# Altium PCB Kasli-DIOT.PCBDOC (part 10 of 23)
Units mm, origin at the board's own origin, x right, y up, seen from the top; angles counter-clockwise.
Board outline 222.9 x 100 mm, 10 copper layers (TopLayer, Layer 2, Layer 3, Layer 4, Layer 5, Layer 6, Layer 7, layer 8, Layer 9, BottomLayer), stack 1.564 mm thick; 977 components, 900 nets, 4676 pads, 2725 vias.
Unrouted connection lines stored in the file: 17.
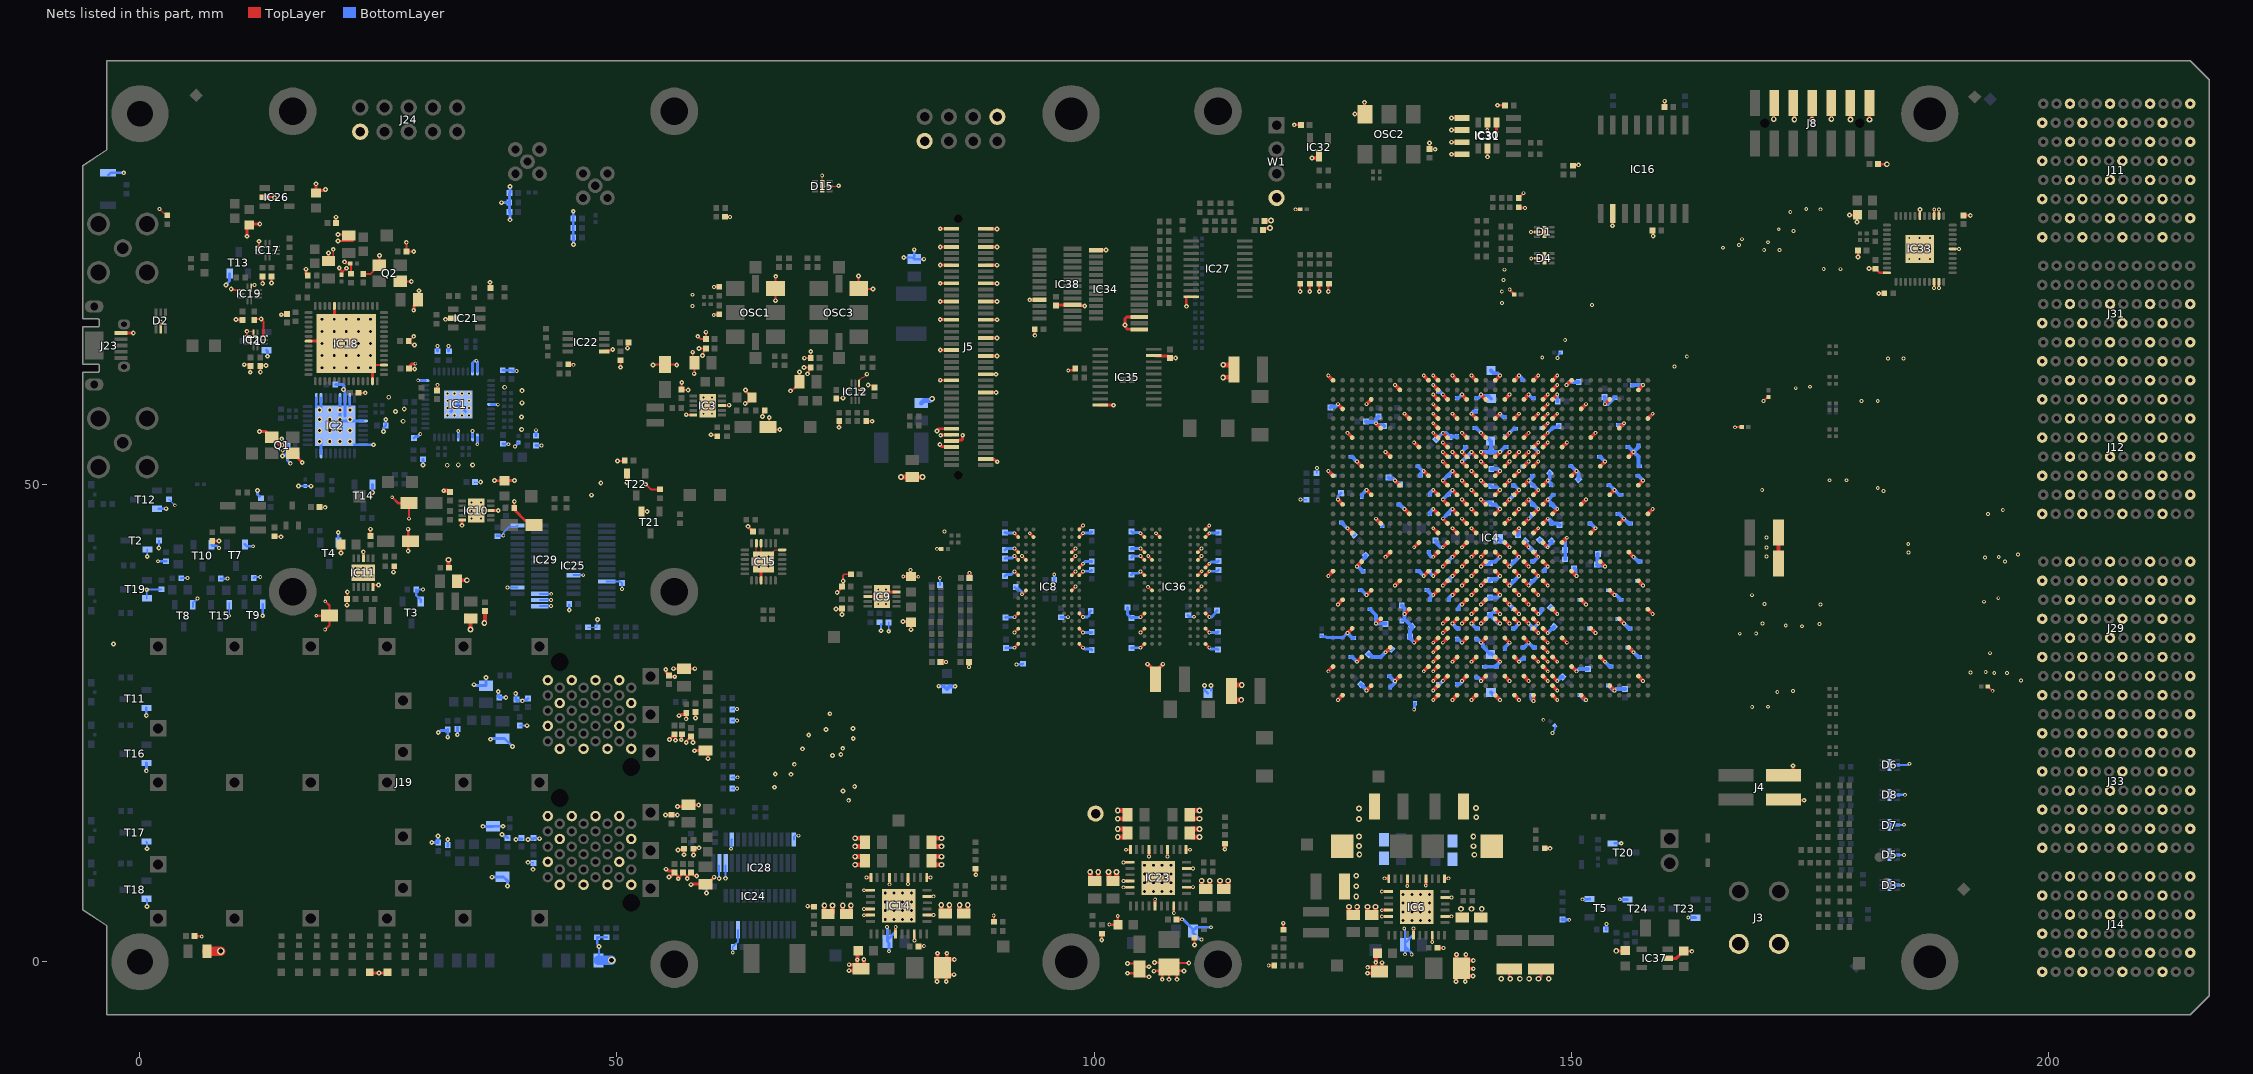
[diagram p16: the nets of this part, all layers, seen from the top]

## Via types
v1: diameter 0.4, hole 0.2, TopLayer to BottomLayer, tented both sides, 1723 vias
v2: diameter 0.5, hole 0.2, TopLayer to BottomLayer, tented both sides, 524 vias
v3: diameter 0.6, hole 0.3, TopLayer to BottomLayer, tented both sides, 172 vias
v4: diameter 0.6, hole 0.3, TopLayer to BottomLayer, 113 vias
v5: diameter 0.5, hole 0.2, TopLayer to BottomLayer, 107 vias
v6: diameter 0.4, hole 0.2, TopLayer to BottomLayer, 67 vias
v7: diameter 0.5, hole 0.25, TopLayer to BottomLayer, tented both sides, 12 vias
v8: diameter 0.8, hole 0.5, TopLayer to BottomLayer, tented both sides, 7 vias

## Nets (pads, with @x,y where several pads share a name; then routed paths per layer and width w, separated by ;. In a path a pad name is that pad's centre, name@x,y a point inside that pad or via, vN(x,y) a via of type N, cw(c..) or ccw(c..) an arc to the next point about the centre after c; other vN are vias at no path point) (continued)
GND: C3.1 C9.2 C12.1 C13.2 C15.1 C16.1 C17.1 C18.1 C19.2 C22.1 C23.1 C24.1 C25.1 C26.1 C27.1 C28.1 C29.1 C30.2 C31.1 C32.2 C33.1 C34.1 C35.1 C36.1 C37.1 C38.1 C39.1 C40.1 C42.1 C43.1 C44.1 C45.2 C46.1 C47.1 C48.1 C49.1 C50.1 C52.1 C53.1 C55.1 C56.1 C57.1 C58.1 C59.1 C60.1 C61.1 C62.1 C64.1 C65.1 C66.1 C67.1 C68.1 C69.1 C75.1 C76.1 C78.1 C79.1 C80.1 C81.1 C82.1 C83.1 C84.1 C85.1 C86.1 C87.1 C88.1 C89.1 C90.1 C91.2 C92.1 C93.1 C94.1 C95.1 C96.1 C97.1 C98.1 C99.1 C101.1 C102.1 C103.1 C104.1 C105.1 C106.1 C107.1 C108.1 C109.1 C110.1 C111.1 C112.1 C113.1 C114.1 C115.1 C116.1 C117.1 C118.1 C119.1 C120.1 C121.1 C122.1 C123.1 C124.1 C125.1 C126.1 C127.1 C128.1 C129.1 C130.1 C131.1 C132.1 C133.1 C134.1 C135.1 C136.1 C137.1 C138.1 C139.1 C140.1 C143.1 C144.1 C145.1 C146.1 C147.1 C148.1 C149.1 C150.1 C151.1 C152.1 C153.1 C154.1 C155.1 C156.1 C158.1 C160.1 C161.1 C162.1 C163.1 C164.1 C165.1 C166.1 C167.1 C168.1 C169.1 C170.1 C171.1 C172.1 C173.1 C174.1 C175.1 C176.1 C177.1 C178.1 C179.1 C180.1 C181.1 C182.1 C183.1 C184.1 C185.1 C186.1 C187.1 C190.1 C191.1 C192.1 C193.1 C194.1 C195.1 C196.1 C197.1 C198.1 C199.1 C200.2 C201.2 C202.1 C203.2 C204.1 C205.1 C206.1 C207.1 C208.1 C209.1 C210.1 C211.1 C212.1 C213.1 C214.1 C215.1 C216.1 C217.1 C218.1 C219.1 C220.2 C221.1 C222.1 C223.1 C224.1 C225.2 C226.1 C227.1 C234.1 C235.1 C238.1 C239.1 C240.1 C241.1 C242.1 C243.1 C244.1 C245.2 C259.1 C260.1 C261.1 C262.1 C263.1 C264.1 C265.1 C266.1 C267.1 C268.1 C269.1 C270.1 C271.1 C272.1 C273.1 C274.1 C275.1 C276.1 C277.1 C278.1 C279.1 C280.1 C281.1 C286.2 C287.1 C288.1 C289.1 C290.1 C291.1 C292.1 C293.1 C295.2 C296.1 C297.2 C298.1 C299.1 C300.2 C301.1 C302.1 C303.1 C304.1 C305.1 C306.1 C307.1 C308.1 C309.1 C310.1 C311.1 C312.1 C313.1 C314.1 C315.1 C316.1 C317.1 C318.1 C319.1 C320.1 C321.1 C322.1 C323.1 C324.1 C325.1 C326.1 C327.1 C328.1 C329.1 C330.1 C331.1 C332.1 C333.1 C334.1 C335.1 C336.1 C337.1 C338.1 C340.1 C341.1 C342.1 C343.1 C344.1 C345.1 C346.2 C347.1 C348.1 C349.1 C350.1 C351.1 C352.1 C353.1 C354.1 C355.1 C356.1 C357.1 C358.1 C359.1 C360.1 C361.1 C362.2 C363.2 C364.2 C365.2 C366.1 C367.1 C368.1 C369.1 C370.1 C371.1 C372.1 C373.1 C374.1 C375.1 C376.1 C377.1 C378.1 C379.1 C380.1 C381.1 C382.1 C383.1 C384.1 C385.1 C386.1 C387.1 C388.1 C389.1 C390.1 C391.1 C396.2 C404.1 C406.1 C407.1 C408.1 C409.1 C412.1 C419.1 C420.1 C422.2 C423.1 C424.1 C425.1 C427.1 C428.1 C429.1 C430.1 C431.1 C432.1 C433.1 C451.1 C452.1 C453.1 C454.1 C455.1 C456.1 C457.1 C458.1 C459.1 C460.1 C461.1 C462.1 C463.1 C464.1 C465.1 C466.1 C467.1 C468.1 C469.1 C470.1 C471.1 C472.1 C473.1 C474.1 C475.1 C476.1 C477.1 C478.1 C480.1 C481.1 C482.1 C483.1 C484.1 C485.1 D1.2 D1.7 D2.2 D3.2 D3.7 D4.2 D4.7 D5.2 D5.7 D6.2 D6.7 D7.2 D7.7 D8.2 D8.7 D15.2 D15.7 IC1.2 IC1.3 IC1.6 IC1.22 IC1.31 IC1.32 IC1.39 IC1.45 IC2.8 IC2.19 IC2.20 IC2.24 IC2.25 IC2.26 IC2.31 IC2.36 IC2.37 IC3.5 IC3.8 IC3.11 IC4.A1 IC4.A11 IC4.A12 IC4.A14 IC4.A16 IC4.A18 IC4.A20 IC4.A22 IC4.A24 IC4.A26 IC4.AA1 IC4.AA11 IC4.AA12 IC4.AA14 IC4.AA16 IC4.AA18 IC4.AA20 IC4.AA22 IC4.AA26 IC4.AB8 IC4.AB13 IC4.AB15 IC4.AB17 IC4.AB19 IC4.AB21 IC4.AB23 IC4.AB33 IC4.AC5 IC4.AC12 IC4.AC14 IC4.AC16 IC4.AC18 IC4.AC20 IC4.AC22 IC4.AC30 IC4.AD2 IC4.AD15 IC4.AD17 IC4.AD19 IC4.AD21 IC4.AD27 IC4.AE9 IC4.AE16 IC4.AE18 IC4.AE20 IC4.AE22 IC4.AE24 IC4.AE34 IC4.AF6 IC4.AF13 IC4.AF14 IC4.AF15 IC4.AF16 IC4.AF17 IC4.AF18 IC4.AF19 IC4.AF20 IC4.AF21 IC4.AF22 IC4.AF31 IC4.AG3 IC4.AG13 IC4.AG22 IC4.AG23 IC4.AG28 IC4.AH10 IC4.AH12 IC4.AH13 IC4.AH15 IC4.AH17 IC4.AH19 IC4.AH21 IC4.AH23 IC4.AH25 IC4.AJ7 IC4.AJ12 IC4.AJ23 IC4.AJ32 IC4.AK4 IC4.AK12 IC4.AK14 IC4.AK16 IC4.AK18 IC4.AK20 IC4.AK22 IC4.AK23 IC4.AK24 IC4.AK29 IC4.AL1 IC4.AL11 IC4.AL12 IC4.AL23 IC4.AL26 IC4.AM8 IC4.AM12 IC4.AM13 IC4.AM15 IC4.AM17 IC4.AM19 IC4.AM21 IC4.AM23 IC4.AM24 IC4.AM33 IC4.AN5 IC4.AN12 IC4.AN24 IC4.AN30 IC4.AP2 IC4.AP12 IC4.AP14 IC4.AP16 IC4.AP18 IC4.AP20 IC4.AP22 IC4.AP24 IC4.AP27 IC4.B8 IC4.B12 IC4.B24 IC4.B33 IC4.C5 IC4.C12 IC4.C13 IC4.C15 IC4.C17 IC4.C19 IC4.C21 IC4.C23 IC4.C24 IC4.C30 IC4.D2 IC4.D12 IC4.D23 IC4.D27 IC4.E9 IC4.E12 IC4.E14 IC4.E16 IC4.E18 IC4.E20 IC4.E22 IC4.E23 IC4.E24 IC4.E34 IC4.F6 IC4.F12 IC4.F23 IC4.F31 IC4.G3 IC4.G12 IC4.G13 IC4.G15 IC4.G17 IC4.G19 IC4.G21 IC4.G23 IC4.G28 IC4.H10 IC4.H13 IC4.H22 IC4.H23 IC4.H25 IC4.J7 IC4.J13 IC4.J14 IC4.J15 IC4.J16 IC4.J17 IC4.J18 IC4.J19 IC4.J20 IC4.J21 IC4.J22 IC4.J32 IC4.K4 IC4.K13 IC4.K15 IC4.K17 IC4.K19 IC4.K21 IC4.K22 IC4.K29 IC4.L1 IC4.L11 IC4.L14 IC4.L16 IC4.L18 IC4.L20 IC4.L26 IC4.M8 IC4.M13 IC4.M15 IC4.M17 IC4.M19 IC4.M21 IC4.M23 IC4.M33 IC4.N5 IC4.N12 IC4.N14 IC4.N16 IC4.N18 IC4.N20 IC4.N22 IC4.N30 IC4.P2 IC4.P13 IC4.P15 IC4.P17 IC4.P19 IC4.P21 IC4.P23 IC4.P27 IC4.R9 IC4.R12 IC4.R14 IC4.R16 IC4.R18 IC4.R20 IC4.R22 IC4.R24 IC4.R34 IC4.T6 IC4.T13 IC4.T15 IC4.T19 IC4.T21 IC4.T23 IC4.T31 IC4.U3 IC4.U12 IC4.U14 IC4.U16 IC4.U20 IC4.U22 IC4.U28 IC4.V10 IC4.V13 IC4.V15 IC4.V19 IC4.V21 IC4.V23 IC4.V25 IC4.W7 IC4.W12 IC4.W14 IC4.W16 IC4.W17 IC4.W18 IC4.W20 IC4.W22 IC4.W32 IC4.Y4 IC4.Y13 IC4.Y15 IC4.Y17 IC4.Y19 IC4.Y21 IC4.Y23 IC4.Y29 IC6.2 IC6.5 IC6.7 IC6.10 IC6.13 IC6.16 IC6.17 IC6.20 IC6.21 IC6.27 IC6.30 IC6.33 IC8.A9 IC8.B1 IC8.B3 IC8.B9 IC8.D1 IC8.D8 IC8.E1 IC8.E2 IC8.E8 IC8.F9 IC8.G1 IC8.G8 IC8.G9 IC8.J2 IC8.J8 IC8.M1 IC8.M9 IC8.P1 IC8.P9 IC8.T1 IC8.T9 IC9.4 IC9.8 IC9.11 IC10.5 IC10.8 IC10.11 IC11.5 IC11.8 IC11.11 IC12.2 IC12.3 IC14.2 IC14.5 IC14.7 IC14.10 IC14.13 IC14.16 IC14.17 IC14.20 IC14.21 IC14.27 IC14.30 IC14.33 IC15.9 IC15.18 IC15.22 IC15.23 IC15.25 IC16.10 IC17.3 IC18.10 IC18.21 IC18.41 IC18.45 IC18.57 IC19.1 IC19.3 IC20.2 IC20.3 IC20.10 IC21.2 IC22.1 IC23.2 IC23.5 IC23.7 IC23.10 IC23.13 IC23.16 IC23.17 IC23.20 IC23.21 IC23.27 IC23.30 IC23.33 IC24.10 IC24.16 IC24.17 IC25.10 IC25.15 IC25.16 IC25.17 IC26.2 IC27.10 IC28.2 IC28.12 IC29.2 IC29.12 IC29.21 IC30.2 IC30.4 IC30.5 IC31.1 IC31.2 IC31.3 IC31.4 IC32.3 IC33.2 IC33.3 IC33.6 IC33.22 IC33.31 IC33.32 IC33.39 IC33.45 IC34.10 IC34.15 IC34.17 IC35.10 IC35.19 IC36.A9 IC36.B1 IC36.B3 IC36.B9 IC36.D1 IC36.D8 IC36.E1 IC36.E2 IC36.E8 IC36.F9 IC36.G1 IC36.G8 IC36.G9 IC36.J2 IC36.J8 IC36.M1 IC36.M9 IC36.P1 IC36.P9 IC36.T1 IC36.T9 IC37.2 IC38.12 IC38.21 J3.1 J3.2 J4.2 J4.4 J5.1 J5.2 J5.7 J5.8 J5.13 J5.14 J5.19 J5.20 J5.25 J5.26 J5.31 J5.32 J5.37 J5.42 J5.43 J5.49 J5.52 J5.55 J5.68 J5.70 J5.72 J5.74 J5.77 J8.1 J8.3 J8.5 J8.7 J8.9 J8.11 J11.A2 J11.A4 J11.A6 J11.A8 J11.C1 J11.C3 J11.C5 J11.C7 J11.D2 J11.D4 J11.D6 J11.D8 J11.F1 J11.F3 J11.F5 J11.F7 J11.G2 J11.G4 J11.G6 J11.G8 J11.I1 J11.I3 J11.I5 J11.I7 J11.J2 J11.J4 J11.J6 J11.J8 J11.L1 J11.L3 J11.L5 J11.L7 J12.A2 J12.A4 J12.A6 J12.A8 J12.C1 J12.C3 J12.C5 J12.C7 J12.D2 J12.D4 J12.D6 J12.D8 J12.F1 J12.F3 J12.F5 J12.F7 J12.G2 J12.G4 J12.G6 J12.G8 J12.I1 J12.I3 J12.I5 J12.I7 J12.J2 J12.J4 J12.J6 J12.J8 J12.L1 J12.L3 J12.L5 J12.L7 J14.A2 J14.A4 J14.A6 J14.C1 J14.C5 J14.D2 J14.D4 J14.D6 J14.F1 J14.F5 J14.G2 J14.G4 J14.G6 J14.I1 J14.I3 J14.I5 J14.J2 J14.J4 J14.J6 J14.L1 J14.L3 J14.L5 J19.LB1 J19.LB10 J19.LB11 J19.LB14 J19.LB17 J19.LB20 J19.LT1 J19.LT10 J19.LT11 J19.LT14 J19.LT17 J19.LT20 J19.RB1 J19.RB10 J19.RB11 J19.RB14 J19.RB17 J19.RB20 J19.RT1 J19.RT10 J19.RT11 J19.RT14 J19.RT17 J19.RT20 J23.5 J24.10 J29.A2 J29.A4 J29.A6 J29.A8 J29.C1 J29.C3 J29.C5 J29.C7 J29.D2 J29.D4 J29.D6 J29.D8 J29.F1 J29.F3 J29.F5 J29.F7 J29.G2 J29.G4 J29.G6 J29.G8 J29.I1 J29.I3 J29.I5 J29.I7 J29.J2 J29.J4 J29.J6 J29.J8 J29.L1 J29.L3 J29.L5 J29.L7 J31.A2 J31.A4 J31.C1 J31.C3 J31.D2 J31.D4 J31.F1 J31.F3 J31.G2 J31.G4 J31.I1 J31.I3 J31.J2 J31.J4 J31.L1 J31.L3 J33.A2 J33.A4 J33.A6 J33.A8 J33.C1 J33.C3 J33.C5 J33.C7 J33.D2 J33.D4 J33.D6 J33.D8 J33.F1 J33.F3 J33.F5 J33.F7 J33.G2 J33.G4 J33.G6 J33.G8 J33.I1 J33.I3 J33.I5 J33.I7 J33.J2 J33.J4 J33.J6 J33.L1 J33.L3 J33.L5 J33.L7 L5.1 LD9.1 LD10.1 OSC1.3 OSC2.3 OSC3.3 Q1.2 Q1.4 Q2.2 Q2.4 R2.1 R7.2 R8.2 R9.1 R13.1 R17.1 R18.1 R19.1 R23.1 R24.1 R25.1 R26.1 R28.1 R29.1 R30.1 R32.1 R33.1 R37.1 R43.1 R45.1 R46.1 R47.1 R60.1 R64.1 R68.2 R70.2 R99.1 R100.1 R125.2 R129.1 R130.1 R140.1 R141.1 R153.1 R154.2 R155.1 R157.1 R166.1 R167.1 R168.1 R169.1 R172.1 R173.1 R193.1 R199.1 R201.1 R208.1 R211.1 R213.1 R214.1 R215.1 R222.1 R223.1 R227.1 R240.1 R243.1 R246.1 R247.1 R251.1 R252.2 R255.1 R256.2 R261.1 R301.1 R304.1 R305.1 R306.2 R307.2 R308.2 R310.2 SW1.2 T1.2 T2.2 T3.2 T4.2 T5.2 T7.2 T8.2 T9.2 T10.2 T11.2 T12.2 T13.2 T14.2 T15.2 T16.2 T17.2 T18.2 T19.2 T20.2 T21.2 T22.2 T23.2 T24.2 TP28.1 TP33.1 TP35.1 W1.4 | length 995.1
  TopLayer w0.095: C296.1@18.786,47.623 18.804,47.641 v2(19.414,47.641)
  TopLayer w0.125: v1(2.034,78.911) 2.472,78.474 2.632,78.474 R301.1@2.859,78.246 ; D2.2@2.181,66.374 v1(2.181,67.125) ; v2(11.201,66.085) 11.871,66.085 11.901,66.055 IC20.2@11.901,65.889 ; R13.1@14.082,44.583 R13.1@14.082,44.583 ; IC15.23@64.611,43.879 64.611,42.679 65.111,42.179 IC15.25@65.361,41.929 66.611,43.179 IC15.18@67.311,43.179 ; v1(71.507,82.418) 71.511,82.414 D15.7@71.511,81.3 D15.2@72.271,81.3 73.19,81.3 v2(73.236,81.346) v2@73.164,81.274 ; C29.1@72.986,59.15 73.025,59.111 v2(73.695,59.111) ; IC12.2@75.7,59.964 IC12.2@75.686,59.95 75.435,59.95 75.4,59.985 75.4,60.636 IC12.3@75.386,60.65 75.386,60.95 75.727,61.291 75.877,61.291 v2(76.186,61.6) ; v2(76.325,60.453) 76.33,60.447 76.86,60.447 C28.1@77.097,60.211
  TopLayer w0.127: IC15.25@65.111,42.179 IC15.22@65.111,43.879
  TopLayer w0.15: IC19.3@10.566,70.415 IC19.3@10.839,70.415 ; IC19.1@11.666,70.665 11.666,70.922 11.689,70.945 12.006,70.945 v6(12.011,70.95)
  TopLayer w0.2: v2(9.561,70.525) 9.671,70.415 IC19.3@10.566,70.415 ; v2(10.926,62.59) 11.456,62.59 C218.1@11.593,62.453 11.563,62.423 v2(11.563,61.797) ; IC20.3@11.201,65.589 v2(11.201,66.085) ; C215.1@11.974,67.379 v2(12.705,67.379) 12.936,67.148 12.936,65.654 IC20.10@13.001,65.589 ; IC17.3@12.461,74.997 v2(12.461,75.525) ; v2(12.613,61.831) 12.613,62.501 12.615,62.5 v2(13.214,62.5) ; v2(12.863,71.113) C217.1@12.863,71.951 ; IC26.2@13.061,80.15 14.054,80.15 v2(14.086,80.118) ; v2(13.783,71.162) C293.1@13.783,71.855 ; R13.1@14.082,44.583 14.101,44.567 14.753,44.567 v2(14.77,44.55) ; C211.1@19.192,73.63 19.761,73.63 v2(19.761,74.3) ; C211.1@20.261,73.387 v2(20.261,74.682) ; v2(20.761,75.55) 22.352,75.55 21.652,76.25 v2(20.761,76.25) ; v2(20.886,72.725) 20.886,72.69 21.118,72.458 ; v2(21.444,73.373) 21.626,73.19 C210.1@22.038,73.19 ; v2(21.636,72.7) 21.352,72.416 ; v2(21.711,37.387) C15.1@21.711,38.037 21.736,38.062 v2(21.736,38.762) ; R199.1@22.134,72.136 C210.1@22.134,73.094 ; C409.1@22.899,59.64 v2(23.614,59.64) ; C208.1@23.404,72.116 24.19,72.116 Q2.2@25.098,73.024 v2(25.098,74.036) ; IC18.57@23.876,62.558 IC18.45@25.576,62.558 IC18.45@25.576,62.608 ; IC11.5@24.411,39.287 24.461,39.337 24.461,39.495 v2(24.988,39.495) ; v2(26.572,40.842) 26.603,40.874 R252.2@26.603,41.434 ; Q2.4@27.298,71.324 v2(28.445,71.324) ; v2(27.918,75.418) C207.1@27.918,74.46 v2(28.696,74.46) ; v2(28.697,65.562) 28.672,65.562 C222.1@28.172,65.062 28.534,64.7 28.715,64.7 v2(28.773,64.643) ; v2@36.667,71.269 v2(36.702,71.234) ; C216.1@36.891,70.79 C216.1@36.906,70.775 ; IC22.1@48.661,63.975 48.761,64.075 49.345,64.075 49.525,64.255 v2@49.607,64.255 ; v2(50.061,52.5) 50.741,52.5 R46.1@50.791,52.55 ; v2(50.361,62.325) R208.1@50.361,63.08 ; v2(51.061,50.25) T22.2@51.061,51.2 ; v2(51.111,64.325) C221.1@51.111,64.95 ; T21.2@52.561,47.2 v2(53.161,47.2) ; v2(53.011,50.05) 53.54,49.52 R33.1@54.511,49.52 ; v2(53.761,62.55) 53.811,62.6 C9.2@55.011,62.6 56.211,62.6 v2(56.261,62.55) ; v2(56.786,60.725) 56.766,60.705 56.766,60.005 C12.1@56.761,60 56.811,59.95 v2(57.461,59.95) ; v2(57.261,57.35) 57.286,57.325 57.986,57.325 IC3.5@58.011,57.3 ; v2(57.936,63.9) 57.941,63.895 57.941,62.97 C288.1@58.111,62.8 58.111,61.675 v2(58.086,61.65) ; v5(58.236,25.55) C276.1@58.235,26.193 ; v2(58.469,65.561) 58.475,65.561 58.736,65.3 C226.1@59.311,65.3 v2(59.311,66) ; v2(58.586,64.3) C287.1@59.311,64.3 59.101,64.09 59.101,64.013 59.061,63.973 59.061,63.828 59.026,63.793 59.026,63.618 v2(58.969,63.561) ; v2(59.861,55.25) 59.918,55.192 60.399,55.192 R251.1@60.511,55.08 ; IC3.8@61.011,58.3 61.036,58.325 61.736,58.325 v2(61.761,58.35) ; v2(65.261,57.15) 65.318,57.207 65.318,57.637 R28.1@65.481,57.8 ; v2(65.961,57.05) 65.961,56.2 C19.2@65.811,56.05 66.061,55.8 v2(67.061,55.8) ; v2(66.611,69.3) OSC1.3@66.611,70.59 66.611,71.825 v2(66.636,71.85) ; v2(68.186,59.85) 68.336,59.85 68.686,60.2 68.686,60.239 C289.1@68.886,60.439 ; v2(69.136,61.825) 69.136,60.825 C289.1@69.111,60.8 ; C289.1@69.527,60.284 69.372,60.439 C289.1@68.886,60.439 ; v2(69.611,62.3) C290.1@70.311,62.3 70.161,62.15 70.161,61.908 69.969,61.717 v2(69.969,61.636) ; v2(69.636,63.275) 70.286,63.275 C291.1@70.311,63.3 v2(70.311,63.975) ; v5(69.986,5.834) 70.016,5.805 70.609,5.805 R64.1@70.638,5.775 ; v2(72.968,36.995) 73.551,36.995 C172.1@73.58,37.025 v2(73.581,36.406) ; v2(73.08,38.7) 73.705,39.325 v2(73.705,39.925) 73.705,40.494 73.836,40.625 C162.1@74.536,40.625 ; v2(75.311,71.9) 75.311,70.615 75.361,70.565 75.382,70.586 75.443,70.525 v2(76.836,70.525) ; v6(83.541,43.292) 83.55,43.284 83.977,43.284 C422.2@83.986,43.275 ; C477.1@86.936,40.227 C477.1@86.951,40.212 ; v6(89.486,4.85) 89.501,4.835 89.501,4.215 R157.1@89.516,4.2 ; v2(121.611,70.25) 121.611,71.025 cw(c121.646,71.025) R166.1@121.621,71.05 ; v2(135.161,85.825) 135.161,85.188 C238.1@135.166,85.183 135.174,85.175 v2(135.761,85.175) ; v6(145.816,76.489) 145.82,76.493 D1.2@146.444,76.493 ; v6(145.827,73.725) 145.851,73.749 D4.2@146.451,73.75 ; D4.2@146.451,73.75 D4.7@147.211,73.75 ; D1.2@146.451,76.5 D1.7@147.211,76.5 ; v1(167.186,56.025) cw(c167.246,55.965) 167.246,56.05 C297.2@167.886,56.05 ; v1(170.184,58.797) 170.508,59.121 cw(c170.703,58.926) C300.2@170.703,59.202 ; C295.2@193.686,28.85 193.711,28.85 194.155,28.406 v1(194.2,28.406) ; 21.118,72.458 21.16,72.416 21.352,72.416 ; 21.118,72.458 C212.1@21.118,72.016 21.218,72.116 21.218,72.282 21.352,72.416 ; C289.1@68.886,60.439 69.111,60.664 C289.1@69.111,60.8 ; C289.1@68.886,60.439 68.75,60.439 C289.1@69.111,60.8
  TopLayer w0.22: IC8.A9@98.458,45.325 IC8.A9@98.461,45.325 ; IC36.A9@111.683,45.325 IC36.A9@111.686,45.325
  TopLayer w0.25: v1(18.475,36.275) 18.487,36.287 C13.2@19.861,36.287 ; v1(19.414,34.825) 19.861,35.272 C13.2@19.861,36.287 ; v1(19.423,37.788) 19.861,37.35 C13.2@19.861,36.287 ; v1(26.437,48.7) 27.057,48.08 C225.2@28.202,48.08 28.199,48.076 v1(28.199,46.449) ; v1(97.305,61.971) 97.333,62 97.721,62 97.725,62.004 97.957,62.004 R240.1@97.967,62.013 ; v2(100.814,2.275) 100.82,2.28 100.82,2.925 R60.1@100.825,2.93 ; v1(101.605,3.896) 102.507,3.896 C391.1@102.511,3.9 102.486,3.925 v1(102.486,4.801) ; v2(103.511,-1.2) 104.353,-1.2 C365.2@104.786,-0.767 ; v2(103.511,-0.181) 104.286,-0.181 104.786,-0.681 C365.2@104.786,-0.767 ; v2(105.763,-0.52) 105.033,-0.52 C365.2@104.786,-0.767 ; v2(105.775,-1.575) 105.742,-1.542 105.286,-1.542 104.786,-1.042 C365.2@104.786,-0.767 ; v2(106.269,-0.983) 106.337,-0.983 106.396,-0.923 C363.2@107.461,-0.923 ; C363.2@108.25,-0.329 C363.2@108.369,-0.21 ; R153.1@110.535,2.526 110.535,1.779 v2(110.539,1.775) ; v3@143.535,-1.674 C56.1@143.535,-0.76 ; v3(146.586,-1.775) 146.86,-1.501 C351.1@146.86,-0.76
  TopLayer w0.254: C396.2@5.725,2.69 6.452,2.69 v1(6.475,2.667) ; v2(10.061,67.336) 10.091,67.305 10.706,67.305 C219.1@10.736,67.275 ; C213.1@20.536,77.45 v5(20.536,78.05) ; v2(24.15,45.35) 24.15,44.678 R25.1@24.166,44.662 ; v2(28.111,43.05) 28.115,43.054 28.115,45.346 v2(28.111,45.35) ; C53.1@61.306,78.095 61.316,78.085 61.851,78.085 v1(61.861,78.075) ; v2(73.279,56.032) 73.291,56.045 R246.1@73.291,56.675 R246.1@73.304,56.687 ; R247.1@76.094,56.687 R247.1@76.106,56.675 76.736,56.675 v2(76.749,56.663) ; R47.1@87.586,9.735 87.599,9.723 87.599,9.138 v2(87.611,9.125) ; v2(106.344,-0.075) C363.2@107.859,-0.075 ; v2(107.157,-1.833) 107.157,-1.287 C363.2@107.791,-0.652 ; v2(107.861,-1.833) 107.861,-0.718 C363.2@108.25,-0.329 ; C363.2@108.235,-0.075 C363.2@107.859,-0.075 ; C363.2@108.369,-0.21 108.456,-0.123 v2(109.936,-0.123) ; v2(108.686,-1.833) 108.686,-1.322 107.913,-0.549 C363.2@107.859,-0.549 C363.2@107.859,-0.075 ; v2(109.428,-0.952) 109.405,-0.929 108.849,-0.929 108.249,-0.329 108.157,-0.181 108.141,-0.156 108.121,-0.136 108.046,-0.061 107.941,-0.061 107.861,-0.061 C363.2@107.859,-0.075 ; v1(118.311,-0.375) R18.1@118.916,-0.375 ; v2(119.836,4.05) 119.842,4.044 119.842,3.381 R37.1@119.847,3.375 ; v5(120.985,87.729) 120.994,87.72 121.692,87.72 C196.1@121.701,87.712 ; v2(122.611,70.25) 122.611,71.025 cw(c122.646,71.025) 122.616,71.043 cw(c122.646,71.025) R167.1@122.621,71.05 ; v2(123.611,70.25) ccw(c123.586,70.275) 123.621,70.275 R168.1@123.621,71.05 ; v2(124.563,70.25) 124.563,70.91 cw(c124.762,70.91) 124.592,71.013 cw(c124.762,70.91) R169.1@124.621,71.05 ; v2(137.461,84.65) 138.556,84.65 IC31.4@138.561,84.645 ; v2(137.463,85.918) 138.559,85.918 IC31.3@138.561,85.915 IC31.3@138.563,85.913 ; v2(137.463,87.188) 138.559,87.188 IC31.2@138.561,87.185 IC31.2@138.563,87.183 ; v2(137.463,88.458) 138.559,88.458 IC31.1@138.561,88.455 IC31.1@138.563,88.453 ; IC30.2@141.236,85.275 141.248,85.263 141.248,84.392 v2(141.259,84.38) ; v1(143.569,70.461) ccw(c143.62,70.461) 143.584,70.425 C203.2@144.061,69.948 ; R172.1@144.536,79.093 144.601,79.028 145.133,79.028 v1(145.161,79) ; R173.1@144.536,80.068 144.536,80.088 145.015,80.568 v1(145.017,80.568) ; R43.1@150.194,83.465 150.218,83.49 150.686,83.49 v2@150.711,83.515 ; v2(154.349,77.155) 154.361,77.168 154.361,77.85 IC16.10@154.37,77.859 ; C204.1@158.561,76.675 158.586,76.65 158.586,76.1 v5(158.611,76.075) ; v2(159.814,90.213) 159.816,90.211 159.816,89.588 C161.1@159.817,89.586 ; v4(171.25,88.325) 171.25,89.989 J8.11@171.286,90.025 ; v2(179.198,78.275) 179.986,78.275 C406.1@180.011,78.3 179.977,78.266 v2(179.977,77.537) ; v2(180.074,73.88) 180.086,73.893 C404.1@180.086,74.575 C404.1@180.095,74.584 ; v2(181.241,72.662) 181.254,72.65 C408.1@181.936,72.65 182.352,72.234 183.102,72.234 IC33.22@183.111,72.225 ; v2(182.257,70.045) 182.272,70.06 182.826,70.06 R155.1@182.841,70.075 ; IC33.6@186.552,78.166 IC33.6@186.561,78.175 186.561,78.857 v2(186.573,78.87) ; IC33.3@188.052,78.166 IC33.3@188.061,78.175 188.061,78.857 v1(188.073,78.87) ; IC33.31@188.061,71.275 IC33.31@188.061,71.275 188.062,70.634 v1(188.063,70.633) ; IC33.2@188.552,78.166 IC33.2@188.561,78.175 188.561,78.857 v1(188.573,78.87) ; IC33.32@188.561,71.275 188.563,71.273 v1(188.563,70.633) ; IC33.39@190.011,74.725 190.018,74.718 190.674,74.718 v1(190.681,74.71) ; C407.1@191.152,78.259 C407.1@191.161,78.25 191.843,78.25 v2(191.856,78.238)
  TopLayer w0.3: J23.5@-2.228,65.902 v2(-0.699,65.902) ; R214.1@7.754,44.147 7.79,44.111 v2(8.281,44.111) ; v2(11.211,76.05) 11.211,76.925 11.436,77.15 C202.1@11.461,77.15 ; C202.1@11.461,77.325 v2(12.561,77.325) ; v2@12.536,55.58 v2(12.536,55.575) 13.21,55.575 Q1.2@13.795,54.99 14.645,54.14 ; v2(14.811,67.825) C223.1@15.403,67.825 ; 15.145,54.14 Q1.4@15.995,53.29 16.071,53.29 v2(17.011,52.35) ; v2(17.411,72.6) 17.411,72.109 R201.1@17.6,71.92 ; IC18.21@17.676,65.058 IC18.57@21.376,65.058 ; v2(18.436,81.55) 18.436,80.67 18.627,80.861 19.298,80.861 19.382,80.945 v2(19.436,80.945) ; IC18.57@20.376,66.058 IC18.10@20.376,68.758 ; C17.1@20.869,43.783 21.056,43.596 v2(21.056,42.85) ; IC11.8@23.411,42.287 v5(23.411,42.975) ; LD10.1@24.038,-1.168 v2(25.043,-1.168) LD9.1@25.901,-1.168 ; IC18.41@24.376,60.858 IC18.57@24.376,62.058 ; v2(28.687,68.297) 28.725,68.335 28.725,68.764 28.755,68.794 28.755,69.005 C206.1@29.13,69.38 ; v2(28.799,62.141) 28.782,62.158 28.203,62.158 C224.1@28.186,62.175 28.346,62.335 28.346,62.572 28.453,62.679 28.842,62.679 v1(28.861,62.698) ; C206.1@29.03,69.38 29.232,69.582 v2(29.232,70.341) ; C49.1@30.986,59.9 31.01,59.9 31.16,60.05 31.16,60.464 v1(31.179,60.483) ; v2(32.011,67.348) 32.049,67.386 32.797,67.386 IC21.2@32.861,67.45 ; v2(33.761,45.75) IC10.5@33.761,46.3 ; v2(36.702,71.234) 36.721,71.215 36.721,70.669 C216.1@36.74,70.65 ; IC10.8@36.761,47.3 37.543,47.3 v2(37.549,47.306) ; v2(37.159,50.44) 37.174,50.425 37.961,50.425 37.982,50.446 v2(39.253,50.446) ; R255.1@39.231,47.55 39.344,47.437 39.344,47.292 40.36,46.275 40.836,46.275 C286.2@41.311,45.8 ; R255.1@39.231,47.57 39.235,47.574 39.235,48.252 v2(39.238,48.256) ; C220.2@44.893,62.633 44.932,62.594 45.417,62.594 v1(45.436,62.575) ; v2(55.088,15.379) 55.106,15.397 55.713,15.397 55.716,15.4 55.719,15.396 56.303,15.396 v2(56.322,15.378) ; v2(55.112,30.639) 55.15,30.601 55.15,30.361 55.301,30.21 55.301,30.135 55.517,29.919 56.014,29.919 v2(56.049,29.884) ; v2(55.128,9.708) 55.165,9.708 55.363,9.51 55.851,9.51 55.961,9.4 55.961,9.3 55.576,8.915 55.503,8.915 v2(55.465,8.876) ; v2(55.511,23.3) 56.006,23.795 56.006,23.945 56.011,23.95 56.011,23.925 56.136,23.8 v2(56.136,23.225) ; v2(55.936,30.725) 56.986,30.725 C264.1@57.011,30.7 57.036,30.725 v2(58.161,30.725) ; C277.1@56.011,9.35 56.386,8.975 56.386,8.747 v2(56.424,8.709) 56.424,8.763 56.746,9.085 C281.1@56.746,9.357 ; v2(56.336,16.275) 57.336,16.275 C280.1@57.511,16.45 v2(58.561,16.45) ; v2(56.394,11.733) 56.432,11.772 56.933,11.772 C244.1@57.011,11.85 57.024,11.837 57.024,11.238 v2(57.036,11.225) ; v2(56.511,25.8) 56.565,25.8 56.705,25.94 57.101,25.94 C259.1@57.261,26.1 57.261,25.475 v2(57.253,25.467) ; v2(56.736,23.275) 56.761,23.3 C263.1@56.761,23.95 ; C281.1@56.906,9.357 57.324,8.939 57.324,8.764 v2(57.363,8.725) ; v2(57.261,23) 57.299,23.038 57.299,23.138 C261.1@57.761,23.6 57.921,23.44 57.921,23.33 57.961,23.29 v2(57.961,22.975) ; v2@57.401,8.925 57.761,9.285 C275.1@57.761,9.35 58.073,9.038 58.323,9.038 v2(58.361,9) ; v2(57.769,8.083) 57.823,8.083 57.89,8.15 C274.1@59.261,8.15 59.461,8.15 v2(60.186,8.875) ; v2(58.03,11.205) 58.02,11.214 58.02,11.816 58.114,11.91 58.564,11.91 v2(58.603,11.948) ; v2(58.111,22.125) 58.12,22.134 59.245,22.134 C260.1@59.261,22.15 59.55,21.861 v2(59.55,21.294) ; v1(60.145,67.815) 60.164,67.834 60.694,67.834 R304.1@60.715,67.855 ; v1(60.172,70.748) 60.191,70.767 R305.1@60.721,70.767 R305.1@60.742,70.788 ; v2(63.436,58.51) 63.474,58.548 63.559,58.548 63.786,58.775 63.836,58.775 C16.1@64.161,59.1 ; v2(63.461,59.95) 63.499,59.911 63.499,59.812 63.786,59.525 63.836,59.525 C16.1@64.161,59.2 ; v2(63.73,45.65) 63.73,45.601 C198.1@64.239,45.092 ; IC15.9@65.111,39.979 IC15.25@65.111,41.679 ; v1(75.883,4.884) 75.891,4.892 IC14.21@76.573,4.892 ; v1(75.883,5.542) 75.891,5.55 IC14.20@76.573,5.55 ; v1(75.883,7.5) 75.891,7.508 IC14.17@76.573,7.508 ; v1(76.161,8.85) 76.611,8.85 IC14.16@76.611,8.838 ; IC9.8@76.28,38.275 v5(77.38,38.275) IC9.11@77.78,38.275 ; IC9.11@78.28,38.775 IC9.4@79.28,38.775 ; v1(78.561,8.125) IC14.13@78.561,8.838 ; IC14.27@79.211,2.913 v1(79.211,3.65) ; v2(79.971,35.667) 80.741,35.667 80.831,35.577 v2(80.831,34.814) ; v1(80.005,40.375) C174.1@80.561,40.375 ; v1(80.511,8.15) IC14.10@80.511,8.838 ; C174.1@80.761,40.517 v1(80.761,41.074) ; C174.1@81.026,40.361 v1(81.583,40.361) ; IC14.30@81.161,2.913 81.161,2.235 v1(81.169,2.227) ; C366.1@81.586,1.625 81.599,1.638 82.148,1.638 v1(82.161,1.65) ; IC14.7@82.461,8.838 82.461,8.85 v1(82.861,8.85) ; IC14.2@82.498,4.892 83.181,4.892 v1(83.189,4.9) ; IC14.5@82.498,6.858 83.181,6.858 v1(83.189,6.866) ; v2(83.541,55.64) 83.778,55.878 J5.68@85.061,55.878 ; v2(83.836,54.216) 83.836,54.196 84.01,54.023 85.011,54.023 J5.74@85.061,53.973 ; v5(83.886,60.965) 83.89,60.961 85.057,60.961 J5.52@85.061,60.958 ; v5(83.886,64.14) 83.89,64.136 85.057,64.136 J5.42@85.061,64.133 ; v5(83.886,67.315) 83.89,67.311 85.057,67.311 J5.32@85.061,67.308 ; v5(83.886,69.22) 83.89,69.216 85.057,69.216 J5.26@85.061,69.213 ; v5(83.886,71.125) 83.89,71.121 85.057,71.121 J5.20@85.061,71.118 ; v5(83.886,73.03) 83.89,73.026 85.057,73.026 J5.14@85.061,73.023 ; v5(83.886,74.935) 83.89,74.931 85.057,74.931 J5.8@85.061,74.928 ; v5(83.886,76.84) 83.89,76.836 85.057,76.836 J5.2@85.061,76.833 ; v2(83.927,55.193) 83.951,55.218 85.036,55.218 J5.70@85.061,55.243 ; J5.72@85.061,54.608 85.111,54.658 85.843,54.658 85.887,54.701 86.156,54.701 86.198,54.743 86.198,55.155 v2(86.236,55.193) ; J5.43@88.657,63.501 J5.43@88.661,63.498 89.828,63.498 v5(89.832,63.494) ; J5.37@88.657,65.406 J5.37@88.661,65.403 89.828,65.403 v5(89.832,65.399) ; J5.31@88.657,67.311 J5.31@88.661,67.308 89.828,67.308 v5(89.832,67.304) ; J5.25@88.657,69.216 J5.25@88.661,69.213 89.828,69.213 v5(89.832,69.209) ; J5.19@88.657,71.121 J5.19@88.661,71.118 89.828,71.118 v5(89.832,71.114) ; J5.13@88.657,73.026 J5.13@88.661,73.023 89.828,73.023 v5(89.832,73.019) ; J5.7@88.657,74.931 J5.7@88.661,74.928 89.828,74.928 v5(89.832,74.924) ; J5.77@88.661,52.703 88.711,52.653 89.57,52.653 89.807,52.416 v2(89.861,52.416) ; J5.1@88.661,76.833 88.665,76.829 89.832,76.829 v5(89.836,76.825) ; J5.55@88.665,59.684 88.671,59.677 89.731,59.677 v5(89.741,59.667) ; J5.49@88.665,61.589 89.734,61.589 v5(89.737,61.586) ; v1(91.661,40.922) IC8.G1@92.061,40.522 ; v1(91.661,42.522) IC8.E1@92.061,42.122 ; v1(91.661,43.322) IC8.D1@92.061,42.922 ; v1(91.661,44.922) IC8.B1@92.061,44.522 ; v1(91.664,32.925) IC8.T1@92.064,33.325 ; v1(91.664,34.525) IC8.P1@92.064,34.925 ; v1(91.664,36.125) IC8.M1@92.064,36.525 ; v1(92.461,42.522) IC8.E2@92.861,42.122 ; v1(92.464,38.525) IC8.J2@92.864,38.925 ; v1(93.261,44.922) IC8.B3@93.661,44.522 ; v2(93.261,69.386) IC38.21@94.297,69.386 ; C192.1@93.792,66.302 C192.1@93.792,66.302 93.793,65.666 v2(93.794,65.665) ; C427.1@96.035,68.813 96.071,68.849 97.711,68.849 IC34.10@97.747,68.886 97.822,68.811 98.919,68.811 98.979,68.751 v2(99.033,68.751) ; IC8.G8@97.658,40.525 v1(98.058,40.925) ; IC8.E8@97.658,42.125 v1(98.058,42.525) ; IC8.D8@97.658,42.925 v1(98.058,43.325) ; IC8.J8@97.661,38.925 v1(98.061,39.325) ; IC8.G9@98.458,40.525 v1(98.858,40.925) ; IC8.F9@98.458,41.325 v1(98.858,41.725) ; IC8.B9@98.458,44.525 v1(98.858,44.925) ; IC8.A9@98.458,45.325 v1(98.858,45.725) ; IC8.T9@98.461,33.328 v1(98.861,32.928) ; IC8.P9@98.461,34.928 v1(98.861,34.528) ; IC8.M9@98.461,36.528 v1(98.861,36.128) ; IC38.12@100.197,74.586 100.207,74.595 101.247,74.595 v2(101.257,74.605) ; IC35.10@100.511,58.354 101.399,58.354 102.022,58.354 v2(102.034,58.342) ; v1(103.083,7.809) 103.091,7.817 IC23.21@103.774,7.817 ; v1(103.083,8.467) 103.091,8.475 IC23.20@103.774,8.475 ; v1(103.083,10.425) 103.091,10.433 IC23.17@103.774,10.433 ; v2(103.261,66.75) 103.299,66.711 103.299,66.543 103.537,66.305 IC34.15@104.728,66.305 ; v2(103.261,66.75) 103.261,67.41 103.437,67.586 IC34.17@104.747,67.586 ; v1(103.361,11.75) 103.811,11.75 IC23.16@103.811,11.763 ; v1(104.886,40.922) IC36.G1@105.286,40.522 ; v1(104.886,42.522) IC36.E1@105.286,42.122 ; v1(104.886,43.322) IC36.D1@105.286,42.922 ; v1(104.886,44.922) IC36.B1@105.286,44.522 ; v1(104.889,32.925) IC36.T1@105.289,33.325 ; v1(104.889,34.525) IC36.P1@105.289,34.925 ; v1(104.889,36.125) IC36.M1@105.289,36.525 ; v1(105.671,39.306) 105.69,39.287 105.721,39.287 IC36.J2@106.086,38.922 ; v1(105.686,42.522) IC36.E2@106.086,42.122 ; IC23.13@105.761,11.763 105.761,11.028 v1(105.763,11.025) ; IC23.27@106.411,5.838 v1(106.411,6.55) ; IC35.19@106.411,63.554 106.454,63.511 107.754,63.511 C186.1@107.962,63.303 v2(108.561,63.303) ; v1(106.486,44.922) IC36.B3@106.886,44.522 ; v1(107.705,11.048) 107.711,11.054 IC23.10@107.711,11.763 ; IC23.30@108.361,5.838 108.361,5.114 v1(108.366,5.109) ; C367.1@108.686,4.525 108.76,4.451 109.228,4.451 v1(109.23,4.453) ; IC23.7@109.661,11.763 109.661,11.75 v1(110.061,11.75) ; v2@109.673,68.719 109.673,69.636 109.748,69.711 IC27.10@110.047,69.711 ; IC23.2@109.699,7.817 110.381,7.817 v1(110.389,7.825) ; IC23.5@109.699,9.783 110.381,9.783 v1(110.389,9.791) ; IC36.G8@110.883,40.525 111.291,40.933 v1(111.291,40.94) ; IC36.E8@110.883,42.125 v1(111.283,42.525) ; IC36.D8@110.883,42.925 v1(111.283,43.325) ; IC36.J8@110.886,38.928 110.886,38.952 111.283,39.349 v1(111.283,39.368) ; IC36.G9@111.683,40.525 112.077,40.919 v1(112.077,40.94) ; IC36.F9@111.683,41.325 v1(112.083,41.725) ; IC36.B9@111.683,44.525 v1(112.083,44.925) ; IC36.A9@111.683,45.325 v1(112.083,45.725) ; IC36.T9@111.686,33.328 v1(112.086,32.928) ; IC36.P9@111.686,34.928 v1(112.086,34.528) ; IC36.M9@111.686,36.528 v1(112.086,36.128) ; C193.1@117.727,76.689 117.887,76.849 118.305,76.849 118.366,76.911 v3(118.447,76.911) ; C292.1@117.842,77.492 118.002,77.652 118.419,77.652 118.481,77.714 v3(118.562,77.714) ; v6(121.136,78.875) C245.2@121.611,78.875 ; v2(127.339,88.862) OSC2.3@128.381,88.862 ; v2(128.361,90.093) 128.361,88.882 OSC2.3@128.381,88.862 ; OSC2.3@128.393,88.85 OSC2.3@128.381,88.862 ; v1(130.17,4.751) 130.179,4.759 IC6.21@130.861,4.759 ; v1(130.17,5.409) 130.179,5.417 IC6.20@130.861,5.417 ; v1(130.17,7.367) 130.179,7.375 IC6.17@130.861,7.375 ; v1(130.461,8.75) 130.898,8.75 IC6.16@130.898,8.705 ; v1(132.838,7.944) 132.848,7.954 IC6.13@132.848,8.705 ; IC6.27@133.498,2.78 133.498,3.48 v1(133.504,3.485) ; v1(134.777,7.991) 134.777,8.018 134.799,8.039 IC6.10@134.799,8.705 ; IC6.30@135.448,2.78 135.448,2.097 v1(135.457,2.089) ; C36.1@135.986,1.475 135.997,1.464 136.625,1.464 v1(136.636,1.454) ; IC6.7@136.748,8.705 136.748,8.75 v1(137.161,8.75) ; IC6.2@136.786,4.759 137.468,4.759 v1(137.477,4.767) ; IC6.5@136.786,6.725 137.468,6.725 v1(137.477,6.733) ; v1(141.216,87.184) 141.226,87.194 141.226,87.965 IC30.5@141.236,87.975 ; v1(142.174,86.961) 142.18,86.967 142.18,87.969 IC30.4@142.186,87.975 ; v2(142.29,89.781) C307.1@142.877,89.781 ; v3(154.742,1.148) 155.654,1.148 C420.1@155.671,1.165 ; IC37.2@160.121,0.365 161.032,0.365 161.444,0.777 161.444,0.802 161.769,1.127 C419.1@161.794,1.127 161.818,1.102 v2(162.661,1.102) ; v4(171.25,88.325) v4@171.272,88.304 ; J4.4@172.258,17.02 172.345,16.932 v2(174.436,16.932) ; J4.2@172.258,19.56 172.776,19.56 173.261,20.045 v2(173.261,20.55) ; J8.9@173.286,90.025 173.411,89.9 v4(173.411,88.3) ; v4(175.261,88.275) 175.261,90 J8.7@175.286,90.025 ; v4(177.286,88.325) J8.5@177.286,90.025 ; v4(179.286,88.3) J8.3@179.286,90.025 ; v4@179.411,88.304 v4@179.411,88.344 ; v4(181.286,88.275) J8.1@181.286,90.025 ; C52.1@182.194,83.6 v4(183.102,83.6)
  TopLayer w0.4: C38.1@32.346,41.334 v3(32.346,42.15) ; C18.1@33.242,39.89 33.346,39.995 v3(34.261,39.995) ; C3.1@34.161,36.313 34.486,35.988 C3.1@34.661,35.988 34.661,34.836 v3(34.65,34.825) ; v3(36.1,35.525) 36.161,35.464 C199.1@36.161,36.788 ; v2(74.311,-0.925) 75.386,-0.925 C364.2@75.586,-0.725 ; v2(74.336,-0.3) 75.161,-0.3 C364.2@75.186,-0.325 ; C382.1@75.286,1.15 75.202,1.066 75.202,0.238 v2(75.182,0.219) 75.186,0.216 C364.2@75.186,-0.325 ; v2(75.876,0.241) 75.876,-0.435 C364.2@75.586,-0.725 ; v2(83.536,-2.075) 83.536,-1.175 C362.2@84.111,-0.6 ; v2(83.586,0.9) 83.586,-0.075 C362.2@84.111,-0.6 ; C475.1@83.927,31.431 83.933,31.425 v1(84.486,31.425) ; C362.2@84.111,-0.45 C362.2@84.586,0.025 ; v2(84.511,-2.05) C362.2@84.511,-1.05 ; v2(84.574,0.901) 84.574,0.037 84.786,0.25 v2(85.361,0.25) ; v2(85.336,-1.35) 84.811,-1.35 C362.2@84.511,-1.05 ; v1(86.911,30.9) 86.911,31.437 C472.1@86.914,31.441 ; C477.1@86.936,40.227 v1(86.936,40.775) ; v5(105.611,31.2) 105.63,31.181 105.68,31.181 C150.1@106.461,30.4 ; C150.1@106.461,29.625 C150.1@106.461,30.4 ; v5(107.211,31.2) 107.192,31.181 107.192,31.131 C150.1@106.461,30.4 ; v5(113.711,11.8) R26.1@113.711,12.38 ; v5(122.836,84.25) 123.486,84.25 123.586,84.35 IC32.3@123.586,84.5 ; v1(124.561,30.45) IC4.AL1@125.061,30.95 ; v1(124.561,40.435) 124.561,40.45 IC4.AA1@125.061,40.95 ; v1(124.561,51.45) IC4.L1@125.061,50.95 ; v1(124.561,61.45) IC4.A1@125.061,60.95 ; v1(125.561,27.45) IC4.AP2@126.061,27.95 ; v1(125.561,37.442) 125.561,37.45 IC4.AD2@126.061,37.95 ; v1(125.561,48.45) IC4.P2@126.061,47.95 ; v1(125.561,58.45) IC4.D2@126.061,57.95 ; v1(126.561,34.45) IC4.AG3@127.061,34.95 ; v1(126.561,45.45) IC4.U3@127.061,44.95 ; v1(126.561,55.45) IC4.G3@127.061,54.95 ; v1(127.561,31.45) IC4.AK4@128.061,31.95 ; v1@127.561,41.45 IC4.Y4@128.061,41.95 ; v1(127.561,52.45) IC4.K4@128.061,51.95 ; v1(128.561,28.45) IC4.AN5@129.061,28.95 ; v1(128.561,38.45) IC4.AC5@129.061,38.95 ; v1(128.561,49.45) IC4.N5@129.061,48.95 ; v1(128.561,58.45) IC4.C5@129.061,58.95 ; v2(128.661,-1.2) 129.736,-1.2 C32.2@129.936,-1 ; v2(128.686,-0.575) 129.511,-0.575 C32.2@129.536,-0.6 ; v1(129.561,35.45) IC4.AF6@130.061,35.95 ; v1(129.561,46.45) IC4.T6@130.061,45.95 ; v1(129.561,56.45) IC4.F6@130.061,55.95 ; C187.1@129.701,0.89 129.552,0.741 129.552,-0.037 v2(129.532,-0.056) 129.536,-0.059 C32.2@129.536,-0.6 ; v2(130.199,-0.09) 130.199,-0.683 130.226,-0.71 C32.2@129.936,-1 ; v1(130.561,32.45) IC4.AJ7@131.061,32.95 ; v1(130.561,42.45) IC4.W7@131.061,42.95 ; v1(130.561,53.45) IC4.J7@131.061,52.95 ; v1(131.561,29.45) IC4.AM8@132.061,29.95 ; v1(131.561,39.45) IC4.AB8@132.061,39.95 ; v1(131.561,50.45) IC4.M8@132.061,49.95 ; v1(131.561,60.45) IC4.B8@132.061,59.95 ; v1(132.561,36.45) IC4.AE9@133.061,36.95 ; v1(132.561,47.45) IC4.R9@133.061,46.95 ; v1(132.561,57.45) IC4.E9@133.061,56.95 ; v1(133.561,33.45) IC4.AH10@134.061,33.95 ; v1(133.561,43.45) IC4.V10@134.061,43.95 ; v1(133.561,54.45) IC4.H10@134.061,53.95 ; v1(134.561,30.45) IC4.AL11@135.061,30.95 ; v1(134.561,40.45) IC4.AA11@135.061,40.95 ; v1(134.561,51.45) IC4.L11@135.061,50.95 ; v1(134.561,61.45) IC4.A11@135.061,60.95 ; v1(135.561,27.45) IC4.AP12@136.061,27.95 ; v1(135.561,28.45) IC4.AN12@136.061,28.95 ; v1(135.561,29.45) IC4.AM12@136.061,29.95 ; v1(135.561,30.45) IC4.AL12@136.061,30.95 ; v1(135.561,31.45) IC4.AK12@136.061,31.95 ; v1(135.561,32.45) IC4.AJ12@136.061,32.95 ; v1(135.561,33.45) IC4.AH12@136.061,33.95 ; v1(135.561,38.45) IC4.AC12@136.061,38.95 ; v1(135.561,40.45) IC4.AA12@136.061,40.95 ; v1(135.561,42.45) IC4.W12@136.061,42.95 ; v1(135.561,45.45) IC4.U12@136.061,44.95 ; v1(135.561,47.45) IC4.R12@136.061,46.95 ; v1(135.561,49.45) IC4.N12@136.061,48.95 ; v1(135.561,55.45) IC4.G12@136.061,54.95 ; v1(135.561,56.45) IC4.F12@136.061,55.95 ; v1(135.561,57.45) IC4.E12@136.061,56.95 ; v1(135.561,58.45) IC4.D12@136.061,57.95 ; v1(135.561,59.45) IC4.C12@136.061,58.95 ; v1(135.561,60.45) IC4.B12@136.061,59.95 ; v1(135.561,61.45) IC4.A12@136.061,60.95 ; v1(136.561,29.45) IC4.AM13@137.061,29.95 ; v1(136.561,33.45) IC4.AH13@137.061,33.95 ; v1(136.561,34.45) IC4.AG13@137.061,34.95 ; v1(136.561,35.45) IC4.AF13@137.061,35.95 ; v1(136.561,39.45) IC4.AB13@137.061,39.95 ; v1(136.561,41.45) IC4.Y13@137.061,41.95 ; v1(136.561,43.45) IC4.V13@137.061,43.95 ; v1(136.561,46.45) IC4.T13@137.061,45.95 ; v1(136.561,48.45) IC4.P13@137.061,47.95 ; v1(136.561,50.45) IC4.M13@137.061,49.95 ; v1(136.561,52.45) IC4.K13@137.061,51.95 ; v1(136.561,53.45) IC4.J13@137.061,52.95 ; v1(136.561,54.45) IC4.H13@137.061,53.95 ; v1(136.561,55.45) IC4.G13@137.061,54.95 ; v1(136.561,59.45) IC4.C13@137.061,58.95 ; v1(137.561,27.45) IC4.AP14@138.061,27.95 ; v1(137.561,31.45) IC4.AK14@138.061,31.95 ; v1(137.561,35.45) IC4.AF14@138.061,35.95 ; v1(137.561,38.45) IC4.AC14@138.061,38.95 ; v1(137.561,40.45) IC4.AA14@138.061,40.95 ; v1(137.561,42.45) IC4.W14@138.061,42.95 ; v1(137.561,45.45) IC4.U14@138.061,44.95 ; v1(137.561,47.45) IC4.R14@138.061,46.95 ; v1(137.561,49.45) IC4.N14@138.061,48.95 ; v1(137.561,51.45) IC4.L14@138.061,50.95 ; v1(137.561,53.45) IC4.J14@138.061,52.95 ; v1(137.561,57.45) IC4.E14@138.061,56.95 ; v1(137.561,61.45) IC4.A14@138.061,60.95 ; v2@137.936,-2 137.936,-1.301 C30.2@138.511,-0.726 ; v2(137.986,0.774) 137.986,-0.201 C30.2@138.511,-0.726 ; C30.2@138.511,-0.776 C30.2@138.511,-0.726 ; C30.2@138.511,-0.576 C30.2@138.986,-0.101 ; v1(138.561,29.45) IC4.AM15@139.061,29.95 ; v1(138.561,33.45) IC4.AH15@139.061,33.95 ; v1(138.561,35.45) IC4.AF15@139.061,35.95 ; v1(138.561,37.45) IC4.AD15@139.061,37.95 ; v1(138.561,39.45) IC4.AB15@139.061,39.95 ; v1(138.561,41.45) IC4.Y15@139.061,41.95 ; v1(138.561,43.45) IC4.V15@139.061,43.95 ; v1(138.561,46.45) IC4.T15@139.061,45.95 ; v1(138.561,48.45) IC4.P15@139.061,47.95 ; v1(138.561,50.45) IC4.M15@139.061,49.95 ; v1(138.561,52.45) IC4.K15@139.061,51.95 ; v1(138.561,53.45) IC4.J15@139.061,52.95 ; v1(138.561,55.45) IC4.G15@139.061,54.95 ; v1(138.561,59.45) IC4.C15@139.061,58.95 ; v2@138.911,-2 C30.2@138.911,-1.176 ; v2(138.974,0.776) 138.974,-0.088 139.187,0.124 v2(139.761,0.124) ; v1(139.561,27.45) IC4.AP16@140.061,27.95 ; v1(139.561,31.45) IC4.AK16@140.061,31.95 ; v1(139.561,35.45) IC4.AF16@140.061,35.95 ; v1(139.561,36.45) IC4.AE16@140.061,36.95 ; v1(139.561,38.45) IC4.AC16@140.061,38.95 ; v1(139.561,40.45) IC4.AA16@140.061,40.95 ; v1(139.561,42.45) IC4.W16@140.061,42.95 ; v1(139.561,45.45) IC4.U16@140.061,44.95 ; v1(139.561,47.45) IC4.R16@140.061,46.95 ; v1(139.561,49.45) IC4.N16@140.061,48.95 ; v1(139.561,51.45) IC4.L16@140.061,50.95 ; v1(139.561,53.45) IC4.J16@140.061,52.95 ; v1(139.561,57.45) IC4.E16@140.061,56.95 ; v1(139.561,61.45) IC4.A16@140.061,60.95 ; v2(139.736,-1.476) 139.211,-1.476 C30.2@138.911,-1.176 ; v2(139.761,-0.726) C30.2@138.511,-0.726 ; v1(140.561,29.45) IC4.AM17@141.061,29.95 ; v1(140.561,33.45) IC4.AH17@141.061,33.95 ; v1(140.561,35.45) IC4.AF17@141.061,35.95 ; v1(140.561,37.45) IC4.AD17@141.061,37.95 ; v1(140.561,39.45) IC4.AB17@141.061,39.95 ; v1(140.561,41.45) IC4.Y17@141.061,41.95 ; v1(140.561,42.45) IC4.W17@141.061,42.95 ; v1(140.561,48.45) IC4.P17@141.061,47.95 ; v1(140.561,50.45) IC4.M17@141.061,49.95 ; v1(140.561,52.45) IC4.K17@141.061,51.95 ; v1(140.561,53.45) IC4.J17@141.061,52.95 ; v1(140.561,55.45) IC4.G17@141.061,54.95 ; v1(140.561,59.45) IC4.C17@141.061,58.95 ; IC4.AP18@142.061,27.95 v1(142.561,27.45) ; IC4.AK18@142.061,31.95 v1(142.561,31.45) ; IC4.AF18@142.061,35.95 v1(142.561,35.45) ; IC4.AE18@142.061,36.95 v1(142.561,36.45) ; IC4.AC18@142.061,38.95 v1(142.561,38.45) ; IC4.AA18@142.061,40.95 v1(142.561,40.45) ; IC4.W18@142.061,42.95 v1(142.561,42.45) ; IC4.R18@142.061,46.95 v1(142.561,47.45) ; IC4.N18@142.061,48.95 v1(142.561,49.45) ; IC4.L18@142.061,50.95 v1(142.561,51.45) ; IC4.J18@142.061,52.95 v1(142.561,53.45) ; IC4.E18@142.061,56.95 v1(142.561,57.45) ; IC4.A18@142.061,60.95 v1(142.561,61.45) ; IC4.AM19@143.061,29.95 v1(143.561,29.45) ; IC4.AH19@143.061,33.95 v1(143.561,33.45) ; IC4.AF19@143.061,35.95 v1(143.561,35.45) ; IC4.AD19@143.061,37.95 v1(143.561,37.45) ; IC4.AB19@143.061,39.95 v1(143.561,39.45) ; IC4.Y19@143.061,41.95 v1(143.561,41.45) ; IC4.V19@143.061,43.95 v1(143.561,43.45) ; IC4.T19@143.061,45.95 v1(143.561,46.45) ; IC4.P19@143.061,47.95 v1(143.561,48.45) ; IC4.M19@143.061,49.95 v1(143.561,50.45) ; IC4.K19@143.061,51.95 v1(143.561,52.45) ; IC4.J19@143.061,52.95 v1(143.561,53.45) ; IC4.G19@143.061,54.95 v1(143.561,55.45) ; IC4.C19@143.061,58.95 v1(143.561,59.45) ; IC4.AP20@144.061,27.95 v1(144.561,27.45) ; IC4.AK20@144.061,31.95 v1(144.561,31.45) ; IC4.AF20@144.061,35.95 v1(144.561,35.45) ; IC4.AE20@144.061,36.95 v1(144.561,36.45) ; IC4.AC20@144.061,38.95 v1(144.561,38.45) ; IC4.AA20@144.061,40.95 v1(144.561,40.45) ; IC4.W20@144.061,42.95 v1(144.561,42.45) ; IC4.U20@144.061,44.95 v1(144.561,45.45) ; IC4.R20@144.061,46.95 v1(144.561,47.45) ; IC4.N20@144.061,48.95 v1(144.561,49.45) ; IC4.L20@144.061,50.95 v1(144.561,51.45) ; IC4.J20@144.061,52.95 v1(144.561,53.45) ; IC4.E20@144.061,56.95 v1(144.561,57.45) ; IC4.A20@144.061,60.95 v1(144.561,61.45) ; IC4.AM21@145.061,29.95 v1(145.561,29.45) ; IC4.AH21@145.061,33.95 v1(145.561,33.45) ; IC4.AF21@145.061,35.95 v1(145.561,35.45) ; IC4.AD21@145.061,37.95 v1(145.561,37.45) ; IC4.AB21@145.061,39.95 v1(145.561,39.45) ; IC4.Y21@145.061,41.95 v1(145.561,41.45) ; IC4.V21@145.061,43.95 v1(145.561,43.45) ; IC4.T21@145.061,45.95 v1(145.561,46.45) ; IC4.P21@145.061,47.95 v1(145.561,48.45) ; IC4.M21@145.061,49.95 v1(145.561,50.45) ; IC4.K21@145.061,51.95 v1(145.561,52.45) ; IC4.J21@145.061,52.95 v1(145.561,53.45) ; IC4.G21@145.061,54.95 v1(145.561,55.45) ; IC4.C21@145.061,58.95 v1(145.561,59.45) ; v1(146.061,27.35) IC4.AP22@146.061,27.95 ; IC4.AK22@146.061,31.95 v1(146.561,31.45) ; IC4.AG22@146.061,34.95 v1(146.561,34.45) ; IC4.AF22@146.061,35.95 v1(146.561,35.45) ; IC4.AE22@146.061,36.95 v1(146.561,36.45) ; IC4.AC22@146.061,38.95 v1(146.561,38.45) ; IC4.AA22@146.061,40.95 v1(146.561,40.45) ; IC4.W22@146.061,42.95 v1(146.561,42.45) ; IC4.U22@146.061,44.95 v1(146.561,45.45) ; IC4.R22@146.061,46.95 v1(146.561,47.45) ; IC4.N22@146.061,48.95 v1(146.561,49.45) ; IC4.K22@146.061,51.95 v1(146.561,52.45) ; IC4.J22@146.061,52.95 v1(146.561,53.45) ; IC4.H22@146.061,53.95 v1(146.561,54.45) ; IC4.E22@146.061,56.95 v1(146.561,57.45) ; IC4.A22@146.061,60.95 v1(146.561,61.45) ; IC4.AM23@147.061,29.95 v1(147.561,29.45) ; IC4.AL23@147.061,30.95 v1(147.561,30.45) ; IC4.AK23@147.061,31.95 v1(147.561,31.45) ; IC4.AJ23@147.061,32.95 v1(147.561,32.45) ; IC4.AH23@147.061,33.95 v1(147.561,33.45) ; IC4.AG23@147.061,34.95 v1(147.561,34.45) ; IC4.AB23@147.061,39.95 v1(147.561,39.45) ; IC4.Y23@147.061,41.95 v1(147.561,41.45) ; IC4.V23@147.061,43.95 v1(147.561,43.45) ; IC4.T23@147.061,45.95 v1(147.561,46.45) ; IC4.P23@147.061,47.95 v1(147.561,48.45) ; IC4.M23@147.061,49.95 v1(147.561,50.45) ; IC4.H23@147.061,53.95 v1(147.561,54.45) ; IC4.G23@147.061,54.95 v1(147.561,55.45) ; IC4.F23@147.061,55.95 v1(147.561,56.45) ; IC4.E23@147.061,56.95 v1(147.561,57.45) ; IC4.D23@147.061,57.95 v1(147.561,58.45) ; IC4.C23@147.061,58.95 v1(147.561,59.45) ; R24.1@147.223,11.905 147.227,11.902 147.786,11.902 v5(147.79,11.898) ; IC4.AP24@148.061,27.95 v1(148.561,27.45) ; IC4.AN24@148.061,28.95 v1(148.561,28.45) ; IC4.AM24@148.061,29.95 v1(148.561,29.45) ; IC4.AK24@148.061,31.95 v1(148.561,31.45) ; IC4.AE24@148.061,36.95 v1(148.561,36.45) ; IC4.R24@148.061,46.95 v1(148.561,47.45) ; IC4.E24@148.061,56.95 v1(148.561,57.45) ; IC4.C24@148.061,58.95 v1(148.561,59.45) ; IC4.B24@148.061,59.95 v1(148.561,60.45) ; IC4.A24@148.061,60.95 v1(148.561,61.45) ; IC4.AH25@149.061,33.95 v1(149.561,33.45) ; IC4.V25@149.061,43.95 v1(149.561,44.45) ; IC4.H25@149.061,53.95 v1(149.561,54.45) ; v1(149.511,60.475) 149.559,60.475 150.034,60.95 IC4.A26@150.061,60.95 ; IC4.AL26@150.061,30.95 v1(150.561,30.45) ; IC4.AA26@150.061,40.95 v1(150.561,40.45) ; IC4.L26@150.061,50.95 v1(150.561,51.45) ; IC4.AP27@151.061,27.95 v1(151.561,27.45) ; IC4.AD27@151.061,37.95 v1(151.561,37.45) ; IC4.P27@151.061,47.95 v1(151.561,48.45) ; IC4.D27@151.061,57.95 v1(151.561,58.45) ; IC4.AG28@152.061,34.95 v1(152.561,34.45) ; IC4.U28@152.061,44.95 v1(152.561,45.45) ; IC4.G28@152.061,54.95 v1(152.561,55.45) ; IC4.AK29@153.061,31.95 v1(153.561,31.45) ; IC4.Y29@153.061,41.95 v1(153.561,41.45) ; IC4.K29@153.061,51.95 v1(153.561,52.45) ; v1(153.561,58.45) IC4.C30@154.061,58.95 ; IC4.AN30@154.061,28.95 v1(154.561,28.45) ; IC4.AC30@154.061,38.95 v1(154.561,38.45) ; IC4.N30@154.061,48.95 v1(154.561,49.45) ; IC4.AF31@155.061,35.95 v1(155.561,35.45) ; IC4.T31@155.061,45.95 v1(155.561,46.45) ; IC4.F31@155.061,55.95 v1(155.561,56.45) ; IC4.AJ32@156.061,32.95 v1(156.561,32.45) ; IC4.W32@156.061,42.95 v1(156.561,42.45) ; IC4.J32@156.061,52.95 v1(156.561,53.45) ; IC4.AM33@157.061,29.95 v1(157.561,29.45) ; IC4.AB33@157.061,39.95 v1(157.561,39.45) ; IC4.M33@157.061,49.95 v1(157.561,50.45) ; IC4.B33@157.061,59.95 v1(157.561,60.45) ; IC4.AE34@158.061,36.95 v1(158.561,36.45) ; IC4.R34@158.061,46.95 v1(158.561,47.45) ; IC4.E34@158.061,56.95 v1(158.561,57.45) ; C65.1@171.736,41.765 C84.1@171.736,44.99 ; C364.2@75.186,-0.325 C364.2@75.586,-0.725 ; C362.2@84.111,-0.6 84.511,-1 C362.2@84.511,-1.05 ; C32.2@129.536,-0.6 C32.2@129.936,-1 ; C30.2@138.511,-0.726 138.911,-1.126 C30.2@138.911,-1.176
  TopLayer w0.5: v2(31.836,49.375) 32.261,49.375 32.326,49.31 32.451,49.31 C278.1@32.511,49.25 ; C390.1@71.736,5.11 v3(71.736,5.91) ; C390.1@72.586,5.11 v3(72.586,5.91) ; C389.1@73.661,5.11 v3(73.661,5.91) ; C389.1@74.511,5.11 v3(74.511,5.91) ; v3(74.961,10.175) C194.1@75.761,10.175 ; v3(74.961,11.025) C194.1@75.761,11.025 ; v3(74.961,12.1) C299.1@75.761,12.1 ; v3(74.961,12.95) C299.1@75.761,12.95 ; v4(79.761,50.825) C424.1@80.936,50.825 v4(82.011,50.825) ; C301.1@83.211,10.175 v3(84.011,10.175) ; C301.1@83.211,11.025 v3(84.011,11.025) ; C195.1@83.211,12.1 v3(84.011,12.1) ; C195.1@83.211,12.95 v3(84.011,12.95) ; C383.1@83.989,5.161 v3(83.989,5.961) ; C383.1@84.839,5.161 v3(84.839,5.961) ; C384.1@85.914,5.161 v3(85.914,5.961) ; C384.1@86.764,5.161 v3(86.764,5.961) ; v3(99.594,9.421) 99.594,9.393 99.634,9.353 99.634,8.549 C381.1@99.659,8.525 ; C381.1@100.444,8.59 v3(100.444,9.421) ; v3(101.519,9.421) 101.519,9.393 101.559,9.353 101.559,8.549 C302.1@101.584,8.525 ; C302.1@102.369,8.59 v3(102.369,9.421) ; v3(102.486,13.075) C303.1@103.286,13.075 ; v3(102.486,13.925) C303.1@103.286,13.925 ; v3(102.486,15) C304.1@103.286,15 ; v3(102.486,15.85) C304.1@103.286,15.85 ; C385.1@110.261,13.075 v3(111.061,13.075) ; C385.1@110.261,13.925 v3(111.061,13.925) ; C386.1@110.261,15 v3(111.061,15) ; C386.1@110.261,15.85 v3(111.061,15.85) ; C387.1@111.284,7.7 v3(111.284,8.5) ; C387.1@112.134,7.7 v3(112.134,8.5) ; C388.1@113.209,7.7 v3(113.209,8.5) ; v3(113.536,61.256) 113.563,61.256 113.585,61.279 114.336,61.279 114.661,61.604 C129.1@114.661,62.075 ; v3(113.548,62.582) 113.568,62.563 114.242,62.563 C129.1@114.294,62.511 ; C388.1@114.059,7.7 v3(114.059,8.5) ; C312.1@114.736,27.455 v3(115.436,27.455) ; C312.1@114.736,29.068 114.736,29.017 v3(115.485,29.017) ; C137.1@126.734,4.975 v3(126.734,5.775) ; C137.1@127.584,4.975 v3(127.584,5.775) ; C144.1@128.659,4.975 v3(128.659,5.775) ; C144.1@129.509,4.975 v3(129.509,5.775)
  TopLayer w0.6: C195.1@82.986,12.625 C195.1@83.211,12.85
  TopLayer w1: R68.2@7.025,1.125 v8(8.469,1.125)
  BottomLayer w0.095: C298.1@35.013,50.298 35.026,50.285 v2(35.71,50.285)
  BottomLayer w0.125: R23.1@3.024,48.48 3.044,48.48 3.272,48.253 3.272,48.233 3.651,47.853 v1(3.651,47.85) ; v2(40.661,10.425) 41.236,10.425 41.261,10.45 41.286,10.425 41.2,10.339 v2(41.2,9.692) ; R213.1@46.947,35.065 R130.1@47.947,35.065 v2(47.947,35.87) ; D6.7@183.386,20.632 D6.2@184.146,20.632
  BottomLayer w0.15: v1(121.661,48.45) 122.276,48.45 R211.1@122.29,48.436 ; R2.1@123.331,51.233 123.361,51.263 v1(123.361,51.75) ; v1(148.065,23.999) 148.065,24.067 148.308,24.31 148.308,24.515 148.326,24.533 148.326,24.71 C200.2@148.308,24.728 ; v1(148.599,63.291) 148.647,63.339 148.647,63.569 148.786,63.708 148.786,63.75 148.911,63.875 C201.2@148.936,63.875
  BottomLayer w0.2: T18.2@0.661,6.6 0.729,6.532 v2(0.729,5.786) ; T17.2@0.661,12.6 0.733,12.528 v2(0.733,11.851) ; T19.2@0.712,38.1 v2(0.712,39.001) 0.739,39.028 2.209,39.028 R227.1@2.236,39.055 ; v2(0.764,42.497) T2.2@0.764,43.212 ; v2(1.976,43.387) R19.1@1.976,44.162 ; T8.2@5.536,37.196 5.536,37.637 5.736,37.837 5.818,37.837 6.044,38.063 v1(6.044,38.083) ; v1(9.355,36.275) T15.2@9.355,37.617 ; v2(14.863,54.817) 14.889,54.817 14.974,54.732 14.974,54.729 15.536,54.167 C25.1@15.561,54.167 15.561,53.825 15.411,53.675 v1@15.069,53.675 ; v2(16.602,49.867) C26.1@17.331,49.867 17.91,49.867 v2(17.917,49.86) v2@17.946,49.86 ; R45.1@28.944,38.8 29.167,39.023 v1(29.661,39.023) ; v1(38.086,44.675) 38.086,44.986 38.704,45.604 39.437,45.604 IC29.12@39.558,45.725 ; v1(38.536,39.25) 38.548,39.238 39.545,39.238 IC29.2@39.558,39.225 ; C183.1@39.811,24.75 v5(40.561,24.75) ; IC25.15@41.908,37.275 41.92,37.288 43.074,37.288 v1(43.086,37.3) ; IC25.16@41.908,37.925 v1(43.086,37.925) ; IC25.17@41.908,38.575 v1(43.111,38.575) ; IC29.21@45.458,40.525 v1(46.461,40.525) ; IC25.10@48.908,39.875 50.345,39.875 C227.1@50.52,39.7 50.536,39.684 v1(50.536,39.075) ; C306.1@59.286,7.875 59.386,7.775 v2(59.386,7.225) ; v2(60.711,8.725) IC24.16@60.711,10.125 ; v2(61.361,8.75) IC24.17@61.361,10.125 ; v1(61.961,11.85) 61.999,11.888 61.999,12.787 IC28.2@62.036,12.825 ; R215.1@62.076,18.152 62.099,18.175 v1(62.586,18.175) ; R193.1@62.076,19.34 62.077,19.339 v1(62.636,19.339) ; R141.1@62.076,25.28 62.077,25.281 v1(62.59,25.281) ; R140.1@62.076,26.468 62.108,26.5 v1(62.586,26.5) ; v1(62.136,0.975) 62.136,1.575 62.346,1.785 62.346,1.788 62.686,2.128 IC24.10@62.686,3.35 ; IC28.12@68.536,12.825 68.536,13.096 68.661,13.221 v1(69.017,13.221) ; v2(77.68,34.7) R129.1@77.68,35.405 ; v2(78.48,34.65) C175.1@78.48,35.575 ; v1(83.836,40.227) 83.836,39.538 C473.1@83.872,39.502 ; C476.1@86.936,40.227 C476.1@86.951,40.212 ; D5.7@183.386,11.209 D5.2@184.146,11.209 ; D8.7@183.386,17.486 D8.2@184.146,17.486 ; D7.7@183.393,14.334 D7.2@184.139,14.334